# Altium PCB PCB1 (2).PcbDoc
Units mm, origin at the board's own origin, x right, y up, seen from the top; angles counter-clockwise.
Board outline 25.02 x 25.2 mm, 2 copper layers (Top Layer, Bottom Layer); 34 components, 30 nets, 142 pads, 45 vias.
Unrouted connection lines stored in the file: 5.
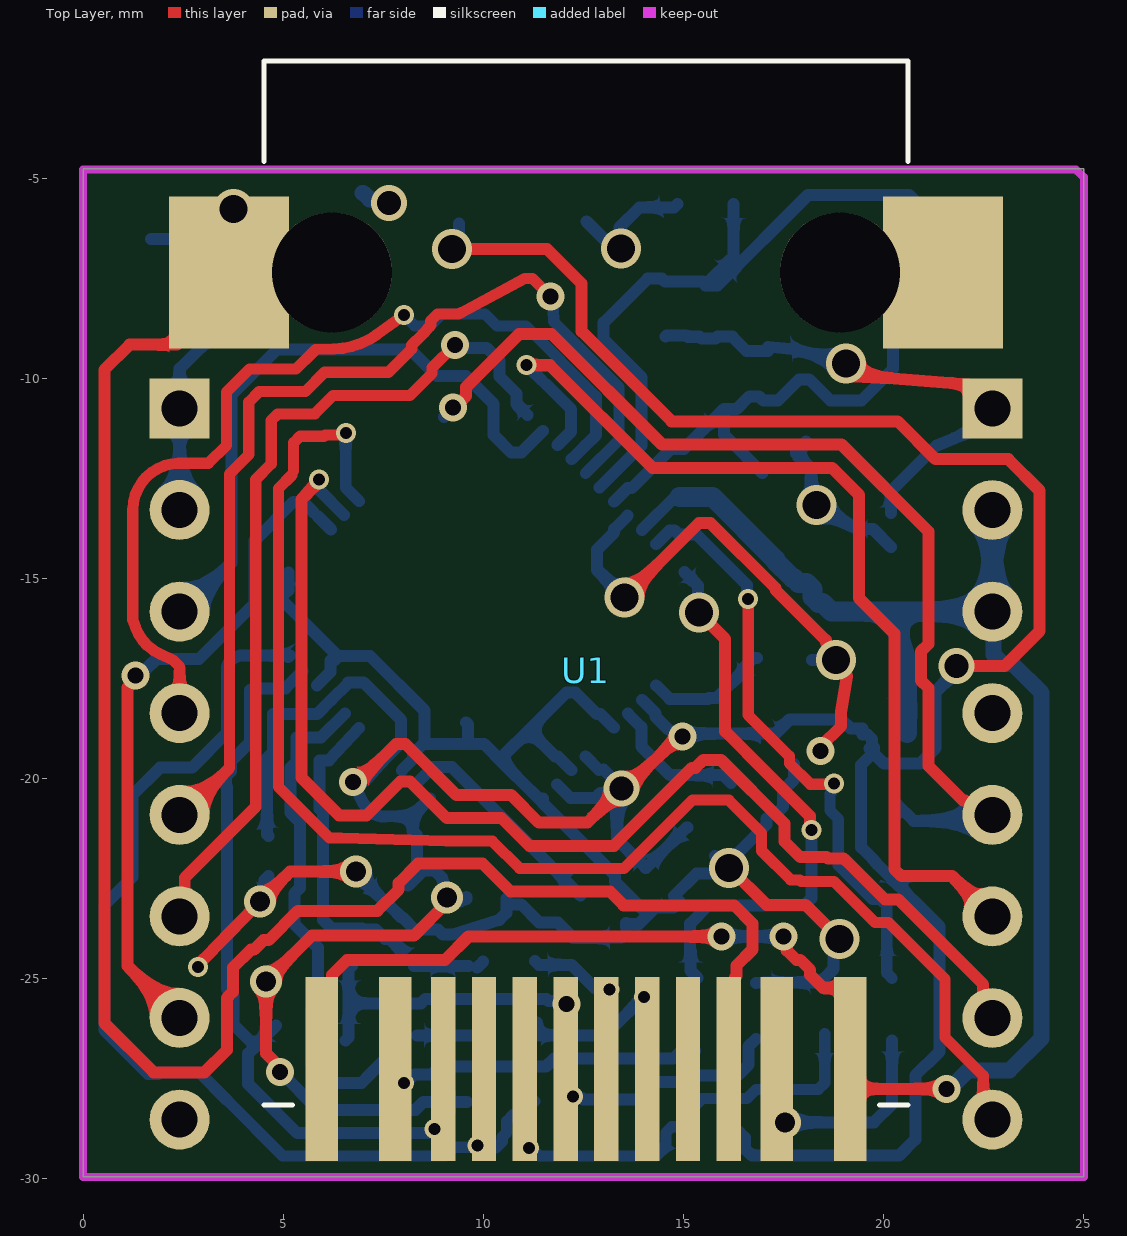
[diagram p0: Top Layer view]
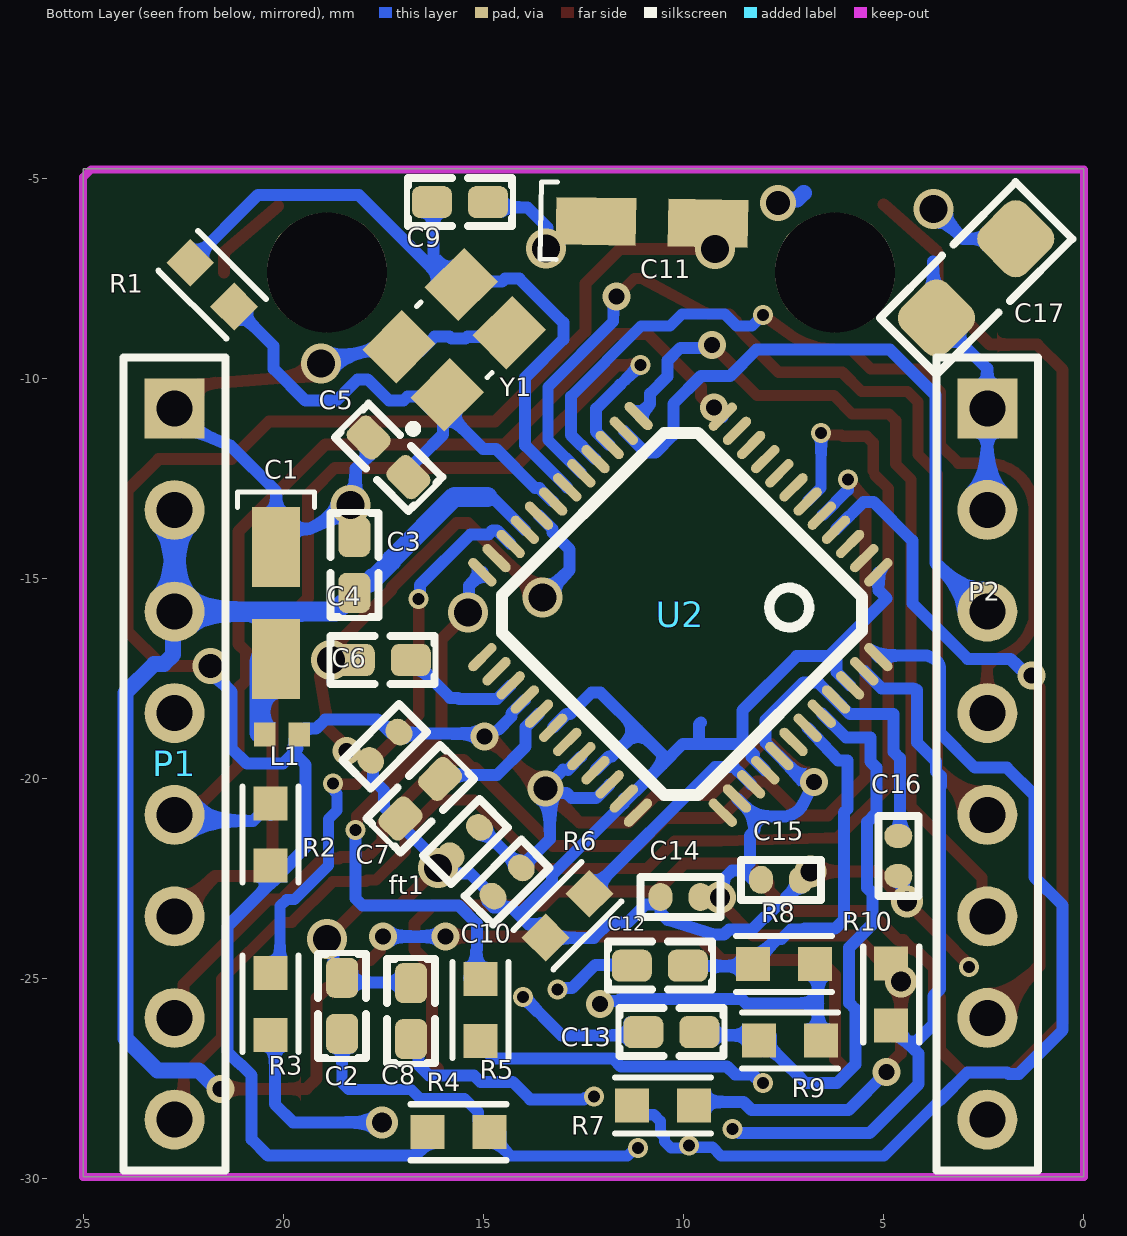
[diagram p1: Bottom Layer view, seen from below]
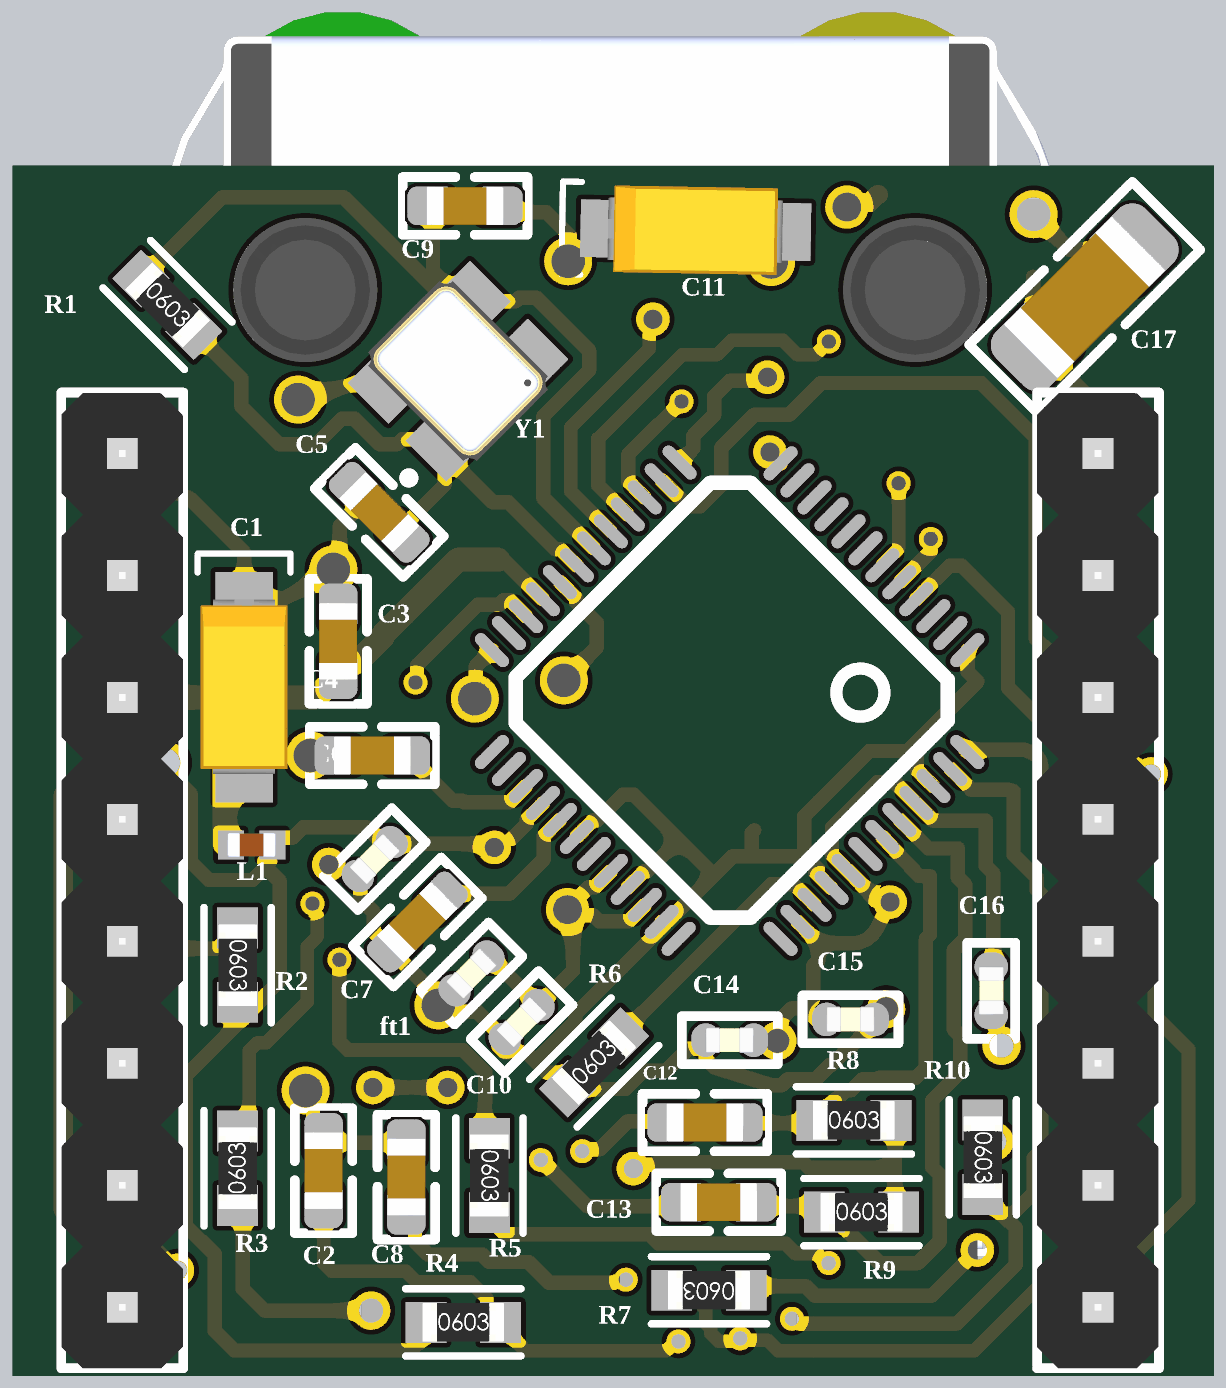
[diagram p2: 3D render of the assembled board from below, using the file's embedded part models]

## Layer stack, top to bottom
Top Solder: solder mask 0.0102, Solder Resist, Dk 3.5
Top Layer: signal copper 0.0356
Dielectric 1: dielectric 0.32, FR-4, Dk 4.8
Bottom Layer: signal copper 0.0356
Bottom Solder: solder mask 0.0102, Solder Resist, Dk 3.5

## Board outline
0,-29.953 0,-4.75 25.019,-4.75 25.019,-29.953

## Design rules (kind name [scope] priority, off if disabled: settings)
Clearance Clearance_1 [All] p1: gap=0.28 ignorepadtopadclearanceinfootprint=TRUE
Clearance "comp to comp clearance" [All] p2: gap=0.28 ignorepadtopadclearanceinfootprint=TRUE
PolygonConnect [All] p1: connectstyle=Relief reliefconductorwidth=0.254 reliefentries=4 polygonreliefangle="90 Angle" airgapwidth=0.254
RoutingVias [All] p1: holewidth=0.711 width=1.27 viastyle="Through Hole" minholewidth=0.711 minwidth=1.27 maxholewidth=0.711 maxwidth=1.27
SolderMaskExpansion [All] p1: expansion=0.102 istentingtop=FALSE
SupplyNets "Schematic Supply Nets_1" [InNet('GND')] p1: voltage=0.000
SupplyNets "Schematic Supply Nets" [InNet('+3.3V')] p2: voltage=0.000
Width [All] p1: maxlimit=1.2 minlimit=0.1 preferedwidth=0.3 minimp=50.000000 maximp=50.000000 favimp=50.000000
30 further rules are at their usual default settings.

## Components (designator, comment, footprint, x,y, rotation, side; value= is the part's Value field where it differs from the comment)
C1 "10uF" "CAPP 1206 (3216X18L) Size A" 20.198,-14.211 r270 bottom value=0 (schematic designator C11)
C2 "22nF" C0603 18.542,-25.679 r270 bottom value=100nf (schematic designator C8)
C3 "0.1uF" C0603 18.237,-14.656 r270 bottom value=100nf (schematic designator C12)
C4 "10nF" C0603 17.527,-17.034 r180 bottom value=100nf (schematic designator C17)
C5 "18pF" C0603 17.382,-11.97 r225 bottom value=100nf (schematic designator C13)
C6 "0.1uF" C0402 17.475,-19.19 r135 bottom value=100nf (schematic designator C3)
C7 "4.7uF" C0603 16.588,-20.501 r135 bottom value=100nf (schematic designator C18)
C8 "10nF" C0603 16.818,-25.812 r270 bottom value=100nf (schematic designator C15)
C9 "18pF" C0603 15.596,-5.588 r0 bottom value=100nf (schematic designator C14)
C10 "0.1uF" C0402 14.417,-22.585 r135 bottom value=100nf (schematic designator C1)
C11 "10uF" "CAPP 1206 (3216X18L) Size A" 12.192,-6.071 r181 bottom value=0 (schematic designator C7)
C12 "6.8nF" C0603 10.601,-24.677 r180 bottom value=100nf (schematic designator C10)
C13 "6.8nF" C0603 10.312,-26.336 r180 bottom value=100nf (schematic designator C9)
C14 "0.1uF" C0402 10.084,-22.962 r180 bottom value=100nf (schematic designator C4)
C15 "0.1uF" C0402 7.569,-22.53 r0 bottom value=100nf (schematic designator C6)
C16 "0.1uF" C0402 4.638,-21.933 r90 bottom value=100nf (schematic designator C5)
C17 "1nF" C1206 2.692,-7.493 r135 bottom value=100nf (schematic designator C16)
ft1 "0.1uF" C0402 15.462,-21.573 r135 bottom value=100nf (schematic designator C2)
L1 "BLM15PD121SN1D" BLM15PD121SN1D 20.067,-18.871 r180 bottom
P1 "Male Header Single 08" "HDR 1X8" 22.732,-10.744 r270 bottom locked (schematic designator P2)
P2 "Male Header Single 08" "HDR 1X8" 2.414,-10.744 r270 bottom locked (schematic designator P1)
R1 "1M" SMD-0603-RES 21.792,-7.651 r315 bottom value=1K (schematic designator R7)
R2 "77k" SMD-0603-RES 20.332,-21.399 r0 bottom value=1K (schematic designator R15)
R3 "330R" SMD-0603-RES 20.332,-25.629 r180 bottom value=1K (schematic designator R13)
R4 "49R9" SMD-0603-RES 15.632,-28.84 r270 bottom value=1K
R5 "330R" SMD-0603-RES 15.088,-25.781 r0 bottom value=1K (schematic designator R1)
R6 "12.4k" SMD-0603-RES 12.907,-23.426 r225 bottom value=1K (schematic designator R14)
R7 "49R9" SMD-0603-RES 10.516,-28.169 r90 bottom value=1K (schematic designator R2)
R8 "49R9" SMD-0603-RES 7.498,-24.633 r270 bottom value=1K (schematic designator R11)
R9 "49R9" SMD-0603-RES 7.341,-26.543 r270 bottom value=1K (schematic designator R12)
R10 "49R9" SMD-0603-RES 4.814,-25.4 r0 bottom value=1K (schematic designator R3)
U1 "HANRUN HR961160C" "HANRUN HR961160C" 12.573,-17.301 r0 top
U2 "W5500" W5500 10.068,-15.883 r45 bottom locked
Y1 "YSX321SL 25 MHZ OSCILLATOR" YSX321SL 15.759,-9.045 r135 bottom

## Footprints (in the part's own frame and the unit in brackets; to place one, negate y for a bottom-side part, rotate by r counter-clockwise, add the part's x,y. Pads: shape width x height; smd on the part's side, far side on the other; paste and mask are expansions set on the pad)
BLM15PD121SN1D [mm]
  rect 0.54x0.6 smd: 1(-0.407,-0.025) 2(0.457,-0.025)
  body extent -0.47,-0.28 0.53,0.22, height 0.55
C0402 [mm] "CHIP Capacitor, 1.0X0.5mm, 0402 (Make www.tarahiboard.com)"
  oval 0.6x0.7 smd mask+0.075: 1(-0.5,0) 2(0.5,0)
  silkscreen extent -1,-0.5 1,0.5, body extent -0.5,-0.27 0.5,0.27, height 0.36
C0603 [mm] "CHIP Capacitor, 1.6X0.8mm, 0603 (Make www.tarahiboard.com)"
  rrect50% 1x0.8 smd mask+0.075: 1(-0.7,0) 2(0.7,0)
  silkscreen extent -1.33,-0.6 1.32,0.6, body extent -0.8,-0.4 0.8,0.4, height 0.9
C1206 [mm] "CHIP Capacitor, 3.2X1.6mm, 1206 (Make www.tarahiboard.com)"
  rrect50% 1.6x1.6 smd mask+0.075: 1(-1.4,0) 2(1.4,0)
  silkscreen extent -2.4,-1 2.4,1, body extent -1.6,-0.8 1.6,0.8, height 1
"CAPP 1206 (3216X18L) Size A" [mm] "Chip Capacitor, 2-Leads, Body 3.2x1.6mm, IPC High Density, chip Tantalum (Make www.tarahiboard.com)"
  rect 1.999x1.199 smd: 1(0,0) 2(2.8,0)
  silkscreen extent -1.38,-0.97 -0.99,0.97, body extent -0.43,-0.9 3.21,0.9, height 1.8
"HANRUN HR961160C" [mm]
  rect 0.81x4.6 smd: 1(-6.61,-9.96) P2(-4.77,-9.96) P11(4.77,-9.96) P12(6.61,-9.96)
  rect 0.61x4.6 smd: P3(-3.57,-9.96) P4(-2.55,-9.96) P5(-1.53,-9.96) P6(-0.51,-9.96) P7(0.51,-9.96) P8(1.53,-9.96) P9(2.55,-9.96) P10(3.57,-9.96)
  rect 3x3.8 smd: SH1(-8.92,9.96) SH2(8.92,9.96)
  round 3 hole 3 unplated: ""(-6.35,9.96) ""(6.35,9.96)
  silkscreen extent -8.05,-10.86 8.05,15.24, body extent -9.57,-11.77 9.57,15.77, height 15.33
"HDR 1X8" [mm] "Connector; Header; 8 Position (Make www.tarahiboard.com)"
  rect 1.5x1.5 hole 0.9: 1(0,0)
  round 1.5 hole 0.9: 2(2.54,0) 3(5.08,0) 4(7.62,0) 5(10.16,0) 6(12.7,0) 7(15.24,0) 8(17.78,0)
  silkscreen extent -1.27,-1.27 19.05,1.27, body extent -1.26,-1.27 19.05,1.26, height 8.51
SMD-0603-RES [mm] "(Make www.tarahiboard.com)"
  rect 0.85x0.85 smd: 1(0,0.775) 2(0,-0.775)
  silkscreen extent -0.7,-1.2 0.7,1.2, body extent -0.4,-0.85 0.4,0.85, height 0.56
W5500 [mm]
  oval 0.9x0.25 smd: 1(-4.25,-2.725) 2(-4.25,-2.225) 3(-4.25,-1.725) 4(-4.25,-1.225) 5(-4.25,-0.725) 6(-4.25,-0.225) 7(-4.25,0.275) 8(-4.25,0.775) 9(-4.25,1.275) 10(-4.25,1.775) 11(-4.25,2.275) 12(-4.25,2.775) 25(4.25,2.775) 26(4.25,2.275) 27(4.25,1.775) 28(4.25,1.275) 29(4.25,0.775) 30(4.25,0.275) 31(4.25,-0.225) 32(4.25,-0.725) 33(4.25,-1.225) 34(4.25,-1.725) 35(4.25,-2.225) 36(4.25,-2.75)
  oval 0.25x0.9 smd: 13(-2.75,4.275) 14(-2.25,4.275) 15(-1.75,4.275) 16(-1.25,4.275) 17(-0.75,4.275) 18(-0.25,4.275) 19(0.25,4.275) 20(0.75,4.275) 21(1.25,4.275) 22(1.75,4.275) 23(2.25,4.275) 24(2.75,4.275) 37(2.75,-4.225) 38(2.25,-4.225) 39(1.75,-4.225) 40(1.25,-4.225) 41(0.75,-4.225) 42(0.25,-4.225) 43(-0.25,-4.225) 44(-0.75,-4.225) 45(-1.25,-4.225) 46(-1.75,-4.225) 47(-2.25,-4.225) 48(-2.75,-4.225)
  silkscreen extent -3.5,-3.5 3.5,3.5
YSX321SL [mm] "YSX321SL 25MHZ"
  rect 1.4x1.2 smd: 1(-1.075,-0.85) 2(1.125,-0.85) 3(1.125,0.85) 4(-1.075,0.85)
  silkscreen extent -2.37,-1.25 0.11,1.25, body extent -1.57,-1.25 1.63,1.25, height 0.75

## Part data
C1 C11: library part "Capacitor Tantalum SMD", "Capacitor Tantalum SMD", ComponentLink1Description=Tarahiboard, ComponentLink1URL=https://www.tarahiboard.com, DatasheetVersion=2022
C2 C3 C4 C5 C7 C8 C9 C12 C13: library part "Capacitor SMD 0603", "Capacitor C SMD 0603", ComponentLink1Description=Tarahiboard, ComponentLink1URL=https://www.tarahiboard.com, DatasheetVersion=2022
C6 C10 C14 C15 C16 ft1: library part "Capacitor SMD 0402", "Capacitor C SMD 0402", ComponentLink1Description=Tarahiboard, ComponentLink1URL=https://www.tarahiboard.com, DatasheetVersion=2022
C17: library part "Capacitor SMD 1206", "Capacitor C SMD 1206", ComponentLink1Description=Tarahiboard, ComponentLink1URL=https://www.tarahiboard.com, DatasheetVersion=2022
P1 P2: "Male, pitch: 2.54mm", ComponentLink1Description=Tarahiboard, ComponentLink1URL=https://www.tarahiboard.com/product/library-pack, DatasheetVersion=2022
R1 R2 R3 R4 R5 R6 R7 R8 R9 R10: library part "Resistor SMD 0603", "Resistor SMD 0603", ComponentLink1Description="Website: Tarahiboard", ComponentLink1URL=https://www.tarahiboard.com/product/library-pack, DatasheetVersion=2022
Y1: library part YSX321SL

## Via types
v1: diameter 0.5, hole 0.3, Top Layer to Bottom Layer, 15 vias
v2: diameter 0.7, hole 0.4, Top Layer to Bottom Layer, 12 vias
v3: diameter 1, hole 0.7, Top Layer to Bottom Layer, 10 vias
v4: diameter 0.8, hole 0.5, Top Layer to Bottom Layer, 5 vias
v5: diameter 0.9, hole 0.6, Top Layer to Bottom Layer, 3 vias

## Nets (pads, with @x,y where several pads share a name; then routed paths per layer and width w, separated by ;. In a path a pad name is that pad's centre, name@x,y a point inside that pad or via, vN(x,y) a via of type N, cw(c..) or ccw(c..) an arc to the next point about the centre after c; other vN are vias at no path point)
+3.3V: C1.2 C3.2 L1.1 P1.2 P1.3 U1.1 U1.P12 U2.28 | length 51.4
  Top Layer w0.3: U1.1 6.218,-27.006 6.218,-24.913 6.601,-24.531 8.386,-24.531 9.054,-24.531 9.637,-23.947 v2(15.956,-23.947) ; v2(17.516,-23.947) 17.592,-24.024 17.592,-24.292 17.83,-24.531 17.926,-24.531 18.178,-24.782 18.178,-24.909 18.504,-25.235 18.928,-25.235 19.183,-25.49 19.183,-27.5 19.438,-27.755 v2(21.586,-27.755)
  Bottom Layer w0.3: U2.28 14.853,-12.901 ; v2(15.956,-23.947) v2(17.516,-23.947)
  Bottom Layer w0.4: v2(21.586,-27.755) 21.667,-27.755 22.128,-27.294 23.161,-27.294 23.962,-26.494 23.962,-17.855 23.241,-17.134 23,-17.134 22.765,-16.9 22.765,-15.858 P1.3
  Bottom Layer w0.5: 14.908,-12.956 15.737,-12.956 17.307,-14.526 17.307,-14.558 17.735,-14.986 17.767,-14.986 17.887,-15.106 18.087,-15.106 18.237,-15.256 C3.2 ; C3.2@18.237,-15.456 18.387,-15.606 18.487,-15.606 18.706,-15.824 20.198,-15.824 ; L1.1@20.604,-18.864 20.604,-17.069 20.198,-15.824 ; P1.2 P1.3 20.198,-15.824
+3V3A: C6.2 C10.2 C11.2 C14.2 C15.2 C16.2 ft1.2 L1.2 R2.1 R4.2 R7.2 R10.2 U2.4 U2.8 U2.11 U2.15 U2.17 U2.21 | length 97
  Top Layer w0.3: v4(4.575,-25.07) 4.575,-26.87 4.928,-27.223 v2(4.928,-27.331) ; v4@4.579,-25.065 5.718,-23.927 8.273,-23.927 9.093,-23.107 v4(9.093,-22.976) ; v2(6.744,-20.086) 6.872,-20.086 7.817,-19.14 8.066,-19.14 9.333,-20.408 10.704,-20.408 11.396,-21.1 12.606,-21.1 v5(13.462,-20.244) ; v3(9.22,-6.756) 11.593,-6.756 12.464,-7.627 12.464,-8.817 14.715,-11.068 20.365,-11.068 21.311,-12.014 21.435,-12.014 23.131,-12.014 23.912,-12.795 23.912,-16.313 23.041,-17.184 v5(21.83,-17.184) ; v5@13.582,-20.244 14.878,-18.948 v2(14.986,-18.948)
  Bottom Layer w0.3: C16.2 4.597,-21.392 4.597,-19.49 4.754,-19.333 4.754,-18.871 4.754,-18.39 5.85,-18.39 6.207,-18.032 6.628,-17.611 6.628,-17.591 7.01,-17.591 7.955,-18.535 7.955,-19.1 U2.8@7.617,-19.437 ; v2(4.928,-27.331) 5.88,-28.283 8.307,-28.283 8.507,-28.083 8.823,-28.083 R7.2@9.604,-28.083 ; U2.8 7.011,-20.077 v2(6.744,-20.086) 7.014,-20.627 ccw(c7.533,-20.368) 7.55,-20.948 8.24,-20.928 ; C15.2@8.13,-22.677 8.506,-22.301 8.552,-22.301 ; U2.11 8.24,-20.928 ; v3(9.22,-6.756) 9.393,-6.584 C11.2 ; C14.2 9.584,-23.012 9.44,-23.074 9.191,-23.074 v4(9.093,-22.976) ; U2.15@11.852,-20.15 12.19,-20.487 12.804,-20.487 12.933,-20.359 v5@13.347,-20.359 ; U2.17@12.56,-19.443 12.897,-19.78 ; 13.017,-19.774 v5@13.475,-20.231 ; v5(13.462,-20.244) v5@13.347,-20.359 ; U2.21@13.974,-18.028 14.311,-18.366 14.311,-18.451 14.63,-18.771 ; v2(14.986,-18.948) 15.063,-18.872 17.312,-18.872 17.66,-18.524 18.967,-18.524 19.189,-18.746 19.489,-18.746 L1.2@19.489,-18.896 ; ft1.2 15.092,-21.219 14.08,-22.231 C10.2 13.347,-21.515 v5@13.347,-20.359 ; R4.2@16.269,-28.702 R4.2 16.544,-28.977 16.544,-29.244 16.723,-29.423 20.401,-29.423 20.806,-29.018 20.806,-27.419 21.081,-27.144 ; L1.2 19.729,-19.016 19.729,-19.178 19.773,-19.222 19.773,-19.374 20.025,-19.626 20.921,-19.626 21.31,-19.237 21.31,-17.839 21.83,-17.32 v5(21.83,-17.184) ; 19.655,-19.241 19.753,-19.356 19.452,-19.657 19.452,-21.717 19.753,-22.018 19.881,-22.168 20.057,-22.344 21.411,-23.698 21.411,-26.828 21.124,-27.114 ; 8.24,-20.928 8.24,-21.31 8.348,-21.417 8.348,-22.102 8.524,-22.278 8.529,-22.278 8.552,-22.301 ; 8.552,-22.301 8.796,-22.301 8.972,-22.477 v4(9.093,-22.976) ; v4(9.093,-22.976) 9.117,-23.198 v4(9.093,-22.976)
ACTLED: R3.1 U2.27 | length 14.9
  Top Layer w0.28: v1(16.627,-15.513) 16.627,-18.405 17.664,-19.442 17.664,-19.623 18.18,-20.14 18.749,-20.14 v1(18.772,-20.117)
  Bottom Layer w0.28: v1(18.772,-20.117) 18.73,-20.159 18.73,-20.314 18.672,-20.372 18.672,-20.798 18.882,-21.008 18.882,-22.168 19.733,-23.019 19.925,-23.019 20.094,-23.187 20.094,-24.859 R3.1@20.226,-24.991
  Bottom Layer w0.3: U2.27 14.666,-13.796 14.785,-13.796 14.88,-13.891 15.331,-13.891 16.595,-15.155 16.595,-15.481 v1(16.627,-15.513)
CGND: C17.2 U1.P10 U1.SH1 U1.SH2 | length 52.3
  Top Layer w0.3: U1.SH1@5.003,-5.643 3.653,-6.841 U1.SH1 3.653,-7.841 2.344,-9.149 1.163,-9.149 0.53,-9.782 0.53,-26.108 1.766,-27.344 3.036,-27.344 3.594,-26.786 3.594,-25.483 3.745,-25.332 3.745,-24.726 4.197,-24.274 4.274,-24.274 4.511,-24.037 4.638,-24.037 5.368,-23.306 6.767,-23.306 7.357,-23.306 7.888,-22.775 7.888,-22.614 8.374,-22.128 9.991,-22.128 10.684,-22.82 13.167,-22.82 13.515,-23.167 16.279,-23.167 16.736,-23.624 16.736,-24.27 16.332,-24.674 16.332,-24.935 16.298,-24.969 16.298,-27.106 U1.P10 ; U1.SH2@20.143,-5.69 21.493,-6.841 U1.SH2
  Bottom Layer w0.3: C17.2 3.016,-6.503 v3(3.756,-5.763)
GND: C1.1 C2.1 C3.1 C4.1 C5.1 C6.1 C7.1 C8.1 C9.1 C10.1 C11.1 C14.1 C15.1 C16.1 C17.1 ft1.1 P1.1 P2.1 P2.2 R6.2 U2.3 U2.9 U2.14 U2.16 U2.19 U2.29 U2.48 Y1.2 Y1.4 | length 91
  Top Layer w0.3: v1(2.87,-24.714) 2.87,-24.66 3.232,-24.299 3.232,-24.296 v4(4.424,-23.077) 5.178,-22.323 5.704,-22.323 6.822,-22.323 v4(6.828,-22.317) ; v3(13.538,-15.469) 15.395,-13.612 15.687,-13.612 17.307,-15.232 17.307,-15.275 18.57,-16.538 18.57,-16.597 18.818,-16.845 v3(18.818,-17.034) 19.101,-17.429 18.951,-18.336 18.951,-18.69 18.434,-19.207 v2(18.434,-19.304) ; v3(16.151,-22.237) 16.169,-22.237 17.09,-23.158 18.064,-23.158 v3(18.916,-24.01) ; v3(19.073,-9.623) 19.323,-9.916 22.132,-10.144 P1.1
  Bottom Layer w0.3: P2.2 P2.1 2.414,-9.751 C17.1 3.767,-8.398 3.767,-7.067 ; v4(4.424,-23.077) 4.52,-22.981 4.52,-22.68 4.531,-22.669 4.531,-22.54 C16.1 ; U2.48@5.131,-14.844 5.131,-15.291 4.928,-15.494 6.374,-16.94 6.384,-16.94 ; U2.3@5.85,-17.67 6.187,-17.332 6.187,-17.05 ; 6.274,-17.05 6.384,-16.94 ; v4(6.828,-22.317) 7.046,-22.551 7.535,-23.077 ccw(c8.069,-22.58) 7.692,-23.205 7.961,-23.473 7.991,-23.473 8.295,-23.778 8.876,-23.778 8.922,-23.823 8.996,-23.897 9.223,-23.897 10.408,-23.53 10.584,-23.354 C14.1@10.584,-22.991 ; v5@7.553,-5.521 v5(7.645,-5.613) ; U2.9@7.971,-19.791 8.308,-19.454 8.248,-19.393 8.509,-19.132 8.535,-19.132 ; 9.576,-18.593 9.627,-18.644 9.627,-19.132 ; C14.1@10.678,-23.143 10.951,-23.143 11.405,-23.597 11.869,-23.597 12.251,-23.979 13.061,-23.979 13.066,-23.974 R6.2 ; U2.16@12.208,-19.783 11.871,-19.446 11.801,-19.446 11.143,-18.789 ; C11.1@12.585,-6.071 13.122,-6.608 13.124,-6.608 13.124,-6.611 v3@13.219,-6.706 ; v3@13.219,-6.742 v3@13.219,-6.706 ; U2.19@13.269,-18.723 12.932,-18.385 12.846,-18.385 12.31,-17.849 12.083,-17.849 11.143,-18.789 ; v3(13.447,-6.742) 13.447,-6.934 v3@13.219,-6.706 ; v3(13.538,-15.469) 12.852,-14.783 12.852,-14.273 13.278,-13.847 13.278,-13.762 U2.29@13.615,-13.425 ; R6.2@13.57,-23.713 13.57,-23.611 13.6,-23.641 13.887,-23.641 14.099,-23.429 ; Y1.2@14.562,-8.95 14.591,-8.921 15.069,-8.921 15.099,-8.95 15.41,-8.95 15.457,-8.997 15.813,-8.997 15.86,-8.95 16.23,-8.95 16.583,-9.303 Y1.4@17.12,-9.303 ; C10.1 15.338,-22.371 16.221,-22.371 v3@16.408,-22.184 ; C9.1@14.863,-5.631 14.777,-5.717 13.913,-5.717 13.411,-6.219 13.411,-6.461 13.219,-6.654 v3@13.219,-6.706 ; C10.1@14.906,-23.074 14.762,-23.217 14.312,-23.217 14.099,-23.429 ; ft1.1@15.804,-21.931 16.057,-22.184 v3@16.204,-22.184 ; v3(16.151,-22.237) v3@16.204,-22.184 ; C8.1 17.018,-25.097 18.342,-25.097 C2.1 18.761,-24.76 18.761,-24.354 18.916,-24.2 v3(18.916,-24.01) ; C7.1 17.083,-21.15 16.302,-21.931 16.302,-22.077 v3@16.306,-22.082 ; Y1.4 17.827,-9.274 v3(19.073,-9.623) ; C7.1@17.33,-20.872 17.501,-20.701 17.501,-20.295 17.774,-20.021 C6.1@17.774,-19.631 ; C5.1@18.077,-11.575 18.027,-11.625 17.826,-11.826 17.826,-11.875 18.204,-12.253 18.204,-13.024 v3(18.338,-13.158) ; C4.1 v3(18.818,-17.034) ; v3(18.338,-13.158) 18.474,-13.292 18.563,-13.34 19.355,-13.759 19.748,-13.759 C1.1 ; C1.1@20.193,-13.36 20.193,-12.816 21.332,-11.677 22.132,-11.344 P1.1 ; 6.384,-16.94 7.18,-16.94 8.535,-18.295 8.535,-19.132 ; 8.535,-19.132 9.627,-19.132 ; 9.627,-19.132 10.022,-19.132 10.536,-19.646 ; 10.536,-19.646 11.182,-20.292 11.19,-20.292 11.274,-20.376 11.447,-20.55 U2.14 11.5,-20.618 13.298,-22.416 13.298,-22.579 14.099,-23.381 14.099,-23.429 ; 10.536,-19.646 10.536,-19.397 11.143,-18.789 ; v3@16.204,-22.184 v3@16.306,-22.082 ; v3@16.204,-22.184 v3@16.408,-22.184 ; v3@16.306,-22.082 v3@16.408,-22.184
  Bottom Layer w0.4: 6.989,-5.355 7.003,-5.355 7.165,-5.518 7.55,-5.518 v5@7.553,-5.521
INTn: P2.6 U2.36 | length 21.7
  Top Layer w0.28: P2.6 2.542,-23.316 2.542,-22.477 4.317,-20.702 4.317,-12.519 4.704,-12.132 4.704,-11.045 4.868,-10.881 5.791,-10.881 6.25,-10.421 8.172,-10.421 8.723,-9.869 8.723,-9.729 v2(9.296,-9.156)
  Bottom Layer w0.3: v2(9.296,-9.156) 9.373,-9.232 10.089,-9.232 10.407,-9.55 10.407,-9.943 10.842,-10.377 10.842,-10.638 U2.36@11.115,-10.912
LINKLED: R5.2 U2.25 | length 14.2
  Top Layer w0.3: v3(15.392,-15.85) 16.053,-16.51 16.053,-18.818 17.094,-19.859 18.174,-20.939 18.174,-21.247 v1(18.212,-21.285)
  Bottom Layer w0.3: U2.25 15.373,-15.177 15.373,-15.83 v3(15.392,-15.85) ; R5.2@15.367,-24.981 15.187,-24.8 15.187,-24.281 15.176,-24.27 15.176,-23.624 15.632,-23.167 18.036,-23.167 18.212,-22.991 v1(18.212,-21.285)
MISO: P1.6 U2.34 | length 24.9
  Top Layer w0.3: v1(11.087,-9.661) 11.668,-9.661 14.235,-12.228 17.953,-12.228 18.723,-12.228 19.268,-12.773 19.398,-12.903 19.398,-15.487 20.284,-16.373 20.284,-22.262 20.46,-22.438 21.725,-22.438 P1.6
  Bottom Layer w0.28: v1(11.087,-9.661) 11.578,-10.151
  Bottom Layer w0.3: 11.591,-10.151 12.192,-10.752 12.192,-10.77 12.197,-10.775 12.197,-11.322 U2.34@11.86,-11.659
MOSI: P2.3 U2.35 | length 16
  Bottom Layer w0.3: P2.3@2.414,-15.9 3.708,-14.606 3.708,-10.414 4.845,-9.277 8.185,-9.277 8.843,-9.936 9.569,-9.936 10.262,-10.628 10.262,-11.405 10.707,-11.85 10.955,-11.85 11.087,-11.718 U2.35
NetC2_2: C2.2 R4.1 U1.P5 | length 9.8
  Bottom Layer w0.28: v1(11.151,-29.235) 11.21,-29.235 11.408,-29.433 14.331,-29.433 14.571,-29.193 14.571,-28.85 14.719,-28.702 14.994,-28.702 15.142,-28.554 15.142,-28.333 15.48,-27.995 16.6,-27.995 16.822,-27.773 18.378,-27.773 18.542,-27.609 C2.2
NetC4_2: C4.2 U2.22 | length 3.1
  Bottom Layer w0.3: U2.22 14.666,-18.006 15.618,-18.006 15.645,-17.979 15.843,-17.979 16.524,-17.298 16.524,-17.225 16.771,-16.978 C4.2@16.844,-16.978
NetC5_2: C5.2 R1.1 U2.30 Y1.1 | length 12.9
  Bottom Layer w0.3: U2.30@13.274,-13.073 13.612,-12.736 13.717,-12.736 14.693,-11.76 15.018,-11.76 Y1.1@16.019,-10.759 ; C5.2@16.987,-12.365 16.602,-11.979 16.602,-11.978 16.019,-11.395 Y1.1@16.019,-10.759 ; R1.1 20.254,-9.189 20.254,-9.757 19.458,-10.553 18.688,-10.553 18.153,-10.017 17.904,-10.017 17.369,-10.553 17.012,-10.553 16.905,-10.445 16.656,-10.445 16.342,-10.759 Y1.1@16.019,-10.759
NetC7_2: C7.2 U2.20 | length 3.6
  Bottom Layer w0.3: U2.20 13.959,-18.713 13.959,-19.197 14.675,-19.914 16.001,-19.914 C7.2@16.193,-20.106
NetC8_2: C8.2 R8.1 R9.1 U1.P6 | length 13
  Bottom Layer w0.3: R9.1 6.642,-26.467 6.642,-25.616 ; R8.1@6.718,-24.689 6.642,-24.765 6.642,-25.616 ; v2(12.09,-25.636) 12.014,-25.559 11.636,-25.559 11.583,-25.506 8.555,-25.506 8.445,-25.616 6.642,-25.616 ; v1(12.248,-27.949) 12.286,-27.987 12.468,-27.987 12.497,-28.016 13.843,-28.016 14.279,-27.58 15.088,-27.58 15.244,-27.425 16.364,-27.425 16.638,-27.151 16.638,-26.692 C8.2
NetC9_2: C9.2 R1.2 U2.31 Y1.3 | length 18.8
  Bottom Layer w0.3: U2.31 13.252,-12.381 13.966,-11.667 13.966,-9.97 13.013,-9.017 13.013,-8.601 14.113,-7.501 14.47,-7.501 14.546,-7.577 15.494,-7.577 Y1.3 ; C9.2@16.263,-5.631 16.263,-6.949 Y1.3 ; R1.2 20.647,-5.411 18.124,-5.411 15.857,-7.677 15.564,-7.677 Y1.3
NetC12_1: C12.1 U1.P7 | length 2.1
  Bottom Layer w0.3: C12.1@11.304,-24.563 11.394,-24.653 12.211,-24.653 12.792,-25.235 13.119,-25.235 v1(13.157,-25.273)
NetC12_2: C12.2 R8.2 U2.6 | length 9.2
  Bottom Layer w0.3: U2.6 6.144,-19.542 5.914,-19.55 5.914,-20.763 5.998,-20.847 5.998,-23.53 6.215,-23.747 6.983,-23.747 7.014,-23.778 7.326,-23.778 7.552,-24.003 7.668,-24.003 R8.2@7.935,-24.27 ; R8.2@8.268,-24.689 C12.2@9.638,-24.689 ; C12.2@9.85,-24.727 C12.2 C12.2@10.002,-24.575
NetC13_1: C13.1 U1.P8 | length 3.4
  Bottom Layer w0.3: C13.1@11.354,-26.097 11.354,-26.411 11.359,-26.416 13.058,-26.416 v1(14.018,-25.456)
NetC13_2: C13.2 R9.2 U2.5 | length 14.5
  Bottom Layer w0.3: U2.5@6.544,-18.374 5.949,-18.97 5.334,-18.97 5.334,-19.573 5.182,-19.726 5.182,-20.851 5.418,-21.087 5.418,-22.735 5.283,-22.87 5.283,-23.636 5.868,-24.221 5.868,-25.605 5.711,-25.762 5.711,-27.146 6.168,-27.603 6.963,-27.603 7.168,-27.398 ; 7.169,-27.398 7.421,-27.146 ; 7.421,-27.146 7.815,-26.751 R9.2@7.815,-26.437 ; R9.2@8.344,-26.416 C13.2@9.689,-26.416
NetR3_2: R3.2 U1.P11 | length 4.5
  Bottom Layer w0.3: v4(17.551,-28.593) 19.769,-28.593 20.226,-28.136 R3.2@20.226,-26.541
NetR5_1: R5.1 U1.P2 | length 7.6
  Bottom Layer w0.3: v1(8.025,-27.603) 8.079,-27.603 8.284,-27.398 8.719,-27.398 8.922,-27.195 11.573,-27.195 11.768,-27 14.759,-27 14.953,-26.806 R5.1@15.295,-26.806
NetR6_1: R6.1 U2.10 | length 5.5
  Bottom Layer w0.3: U2.10 8.655,-19.806 ; 8.749,-19.712 9.222,-19.712 R6.1@12.434,-22.923
NetR7_1: R7.1 U1.P4 U2.1 | length 25.6
  Bottom Layer w0.28: 3.594,-28.035 4.992,-29.433 9.066,-29.433 9.284,-29.215 9.825,-29.215 v1(9.867,-29.172) 9.927,-29.172 9.989,-29.234 10.317,-29.234 10.481,-29.07 10.481,-28.958 10.586,-28.853 10.586,-28.567 10.75,-28.403 11.006,-28.403 11.006,-28.352 R7.1@11.291,-28.067
  Bottom Layer w0.3: 3.594,-28.035 2.903,-27.344 1.925,-27.344 1.888,-27.381 1.621,-27.381 0.53,-26.29 0.53,-23.168 1.234,-22.464 1.234,-20.415 1.925,-19.724 2.723,-19.724 3.594,-18.853 3.594,-17.259 cw(c3.894,-17.259) 3.779,-16.983 3.937,-16.916 5.136,-16.916 5.173,-16.916 U2.1@5.13,-16.96
NetR10_1: R10.1 U1.P3 U2.2 | length 18
  Bottom Layer w0.3: R10.1@4.826,-26.175 R10.1@4.424,-26.577 ; U2.2@5.483,-17.314 5.146,-17.651 5.058,-17.739 5.058,-17.746 4.312,-17.746 ccw(c4.312,-18.046) 4.174,-17.78 4.174,-18.631 4.174,-19.093 3.693,-19.574 3.693,-19.822 3.576,-19.939 3.576,-20.188 3.594,-20.206 3.594,-25.263 3.759,-25.428 3.759,-26.142 4.194,-26.577 R10.1@4.424,-26.577 ; v1(8.788,-28.763) 8.734,-28.763 8.634,-28.863 5.356,-28.863 4.127,-27.633 4.127,-26.874 R10.1@4.424,-26.577
PMODE0: P2.7 U2.45 | length 17
  Top Layer w0.3: v2(1.31,-17.419) 1.31,-17.527 1.11,-17.727 1.11,-24.68 P2.7
  Bottom Layer w0.3: v2(1.31,-17.419) 1.418,-17.419 1.833,-17.004 2.903,-17.004 4.288,-15.618 4.288,-14.05 5.258,-13.081 5.506,-13.081 5.766,-13.341 5.766,-13.348 ; 5.861,-13.436 U2.45@6.198,-13.773
PMODE1: P1.7 U2.44 | length 31.6
  Top Layer w0.3: v1(5.898,-12.525) 5.898,-12.579 5.457,-13.02 5.457,-19.973 6.4,-20.916 7.088,-20.916 7.93,-20.074 8.179,-20.074 9.093,-20.988 10.464,-20.988 11.156,-21.68 13.27,-21.68 15.222,-19.728 15.309,-19.728 15.505,-19.533 15.947,-19.533 17.532,-21.117 17.532,-21.567 17.93,-21.965 18.587,-21.965 18.62,-21.999 19.011,-21.999 19.044,-22.032 19.058,-22.032 20.044,-23.018 20.376,-23.018 22.502,-25.144 22.502,-25.755 P1.7
  Bottom Layer w0.3: v1(5.898,-12.525) 5.898,-12.781 U2.44@6.528,-13.411
PMODE2: P1.8 U2.43 | length 36.2
  Top Layer w0.28: 5.218,-12.41 5.218,-12.415 4.887,-12.746 4.887,-20.209 6.164,-21.486 6.449,-21.486 9.078,-21.557 ccw(c9.093,-20.988) 9.093,-21.558 10.227,-21.558 10.92,-22.25 13.521,-22.25 15.236,-20.534 16.14,-20.534 16.962,-21.356 16.962,-21.803 17.694,-22.535 17.918,-22.535 17.951,-22.568 18.775,-22.568 19.804,-23.598 20.136,-23.598 21.552,-25.014 21.552,-26.473 22.502,-27.423 22.502,-28.295 P1.8 ; 5.264,-12.301 5.264,-11.605 5.428,-11.441 6.023,-11.441 6.057,-11.407 6.526,-11.407 v1(6.568,-11.365)
  Bottom Layer w0.28: v1(6.568,-11.365) 6.568,-12.729 U2.43@6.905,-13.066
RSTn: P1.5 R2.2 U2.37 | length 25.5
  Top Layer w0.3: v2@9.496,-10.516 9.572,-10.439 9.572,-10.214 10.899,-8.887 11.714,-8.887 14.475,-11.648 18.963,-11.648 18.974,-11.659 21.133,-13.818 21.133,-16.637 20.95,-16.82 20.95,-17.549 21.133,-17.731 21.133,-19.68 21.996,-20.543 22.046,-20.543 22.502,-20.999 P1.5@22.502,-21.049
  Bottom Layer w0.3: U2.37@9.029,-10.955 v2@9.243,-10.741 ; v2@9.22,-10.744 9.246,-10.719 v2(9.246,-10.716) ; R2.2@20.332,-20.906 R2.2@20.344,-20.893 ; R2.2 20.765,-21.057 22.58,-21.057 P1.5
SCLK: P2.4 U2.33 | length 23
  Top Layer w0.28: P2.4 2.414,-17.197 2.25,-17.033 1.935,-16.891 cw(c2.414,-15.824) 1.312,-16.218 1.244,-16.027 1.244,-15.94 1.244,-13.271 1.244,-13.259 cw(c2.414,-13.284) 2.389,-12.114 cw(c2.414,-13.284) 2.439,-12.114 3.138,-12.114 3.584,-11.668 3.584,-10.335 4.159,-9.761 5.327,-9.761 5.735,-9.353 5.817,-9.271 6.266,-9.26 6.271,-9.26 ccw(c6.223,-7.341) 7.343,-8.9 v1(8.021,-8.414)
  Bottom Layer w0.28: v1(8.021,-8.414) 8.295,-8.687 8.676,-8.687 8.977,-8.386 10.049,-8.386 10.35,-8.687 11.07,-8.687 12.826,-10.442
  Bottom Layer w0.3: U2.33@12.214,-12.013 12.551,-11.675 ; 12.557,-11.677 12.826,-11.408 12.826,-10.442
SCSn: P2.5 U2.32 | length 25.6
  Top Layer w0.28: P2.5@2.414,-20.98 3.658,-19.737 3.658,-12.386 4.144,-11.9 4.144,-10.581 4.405,-10.321 5.559,-10.321 6.039,-9.841 7.634,-9.841 8.135,-9.34 8.216,-9.259 8.216,-9.166 8.489,-8.893 8.535,-8.846 8.541,-8.84 8.622,-8.746 8.666,-8.695 8.684,-8.671 8.691,-8.66 8.691,-8.558 8.863,-8.386 9.319,-8.386 9.389,-8.386 9.451,-8.352 11.046,-7.498 11.232,-7.498 v2(11.684,-7.95)
  Bottom Layer w0.28: v2(11.684,-7.95) 11.764,-8.031 11.764,-8.575 13.396,-10.206 13.396,-11.53 U2.32
pads on no net: P1.4 P2.8 U1. U1.P9 U2.7 U2.12 U2.13 U2.18 U2.23 U2.24 U2.26 U2.38 U2.39 U2.40 U2.41 U2.42 U2.46 U2.47

## Keep-outs
Keep-Out Layer:
  lines w0.2: 0,-29.953 0.019,-29.953 25.019,-29.953 25.019,-4.953 25,-4.953 24.956,-4.909 24.867,-4.82 24.822,-4.775 0,-4.775 0,-29.953

## Silkscreen, mask and mechanical layers (free items; w line width, h text height)
Mechanical 1:
  lines w0.2: 0,-29.953 0.019,-29.953 6.269,-29.953 18.769,-29.953 25.019,-29.953 25.019,-4.75 0,-4.75 0,-29.953